# Altium PCB Car_wash_machine.PcbDoc (part 3 of 6)
Units mm, origin at the board's own origin, x right, y up, seen from the top; angles counter-clockwise.
Board outline 229.74 x 149.86 mm, 2 copper layers (Top Layer, Bottom Layer); 256 components, 170 nets, 868 pads, 731 vias.
Unrouted connection lines stored in the file: 362.
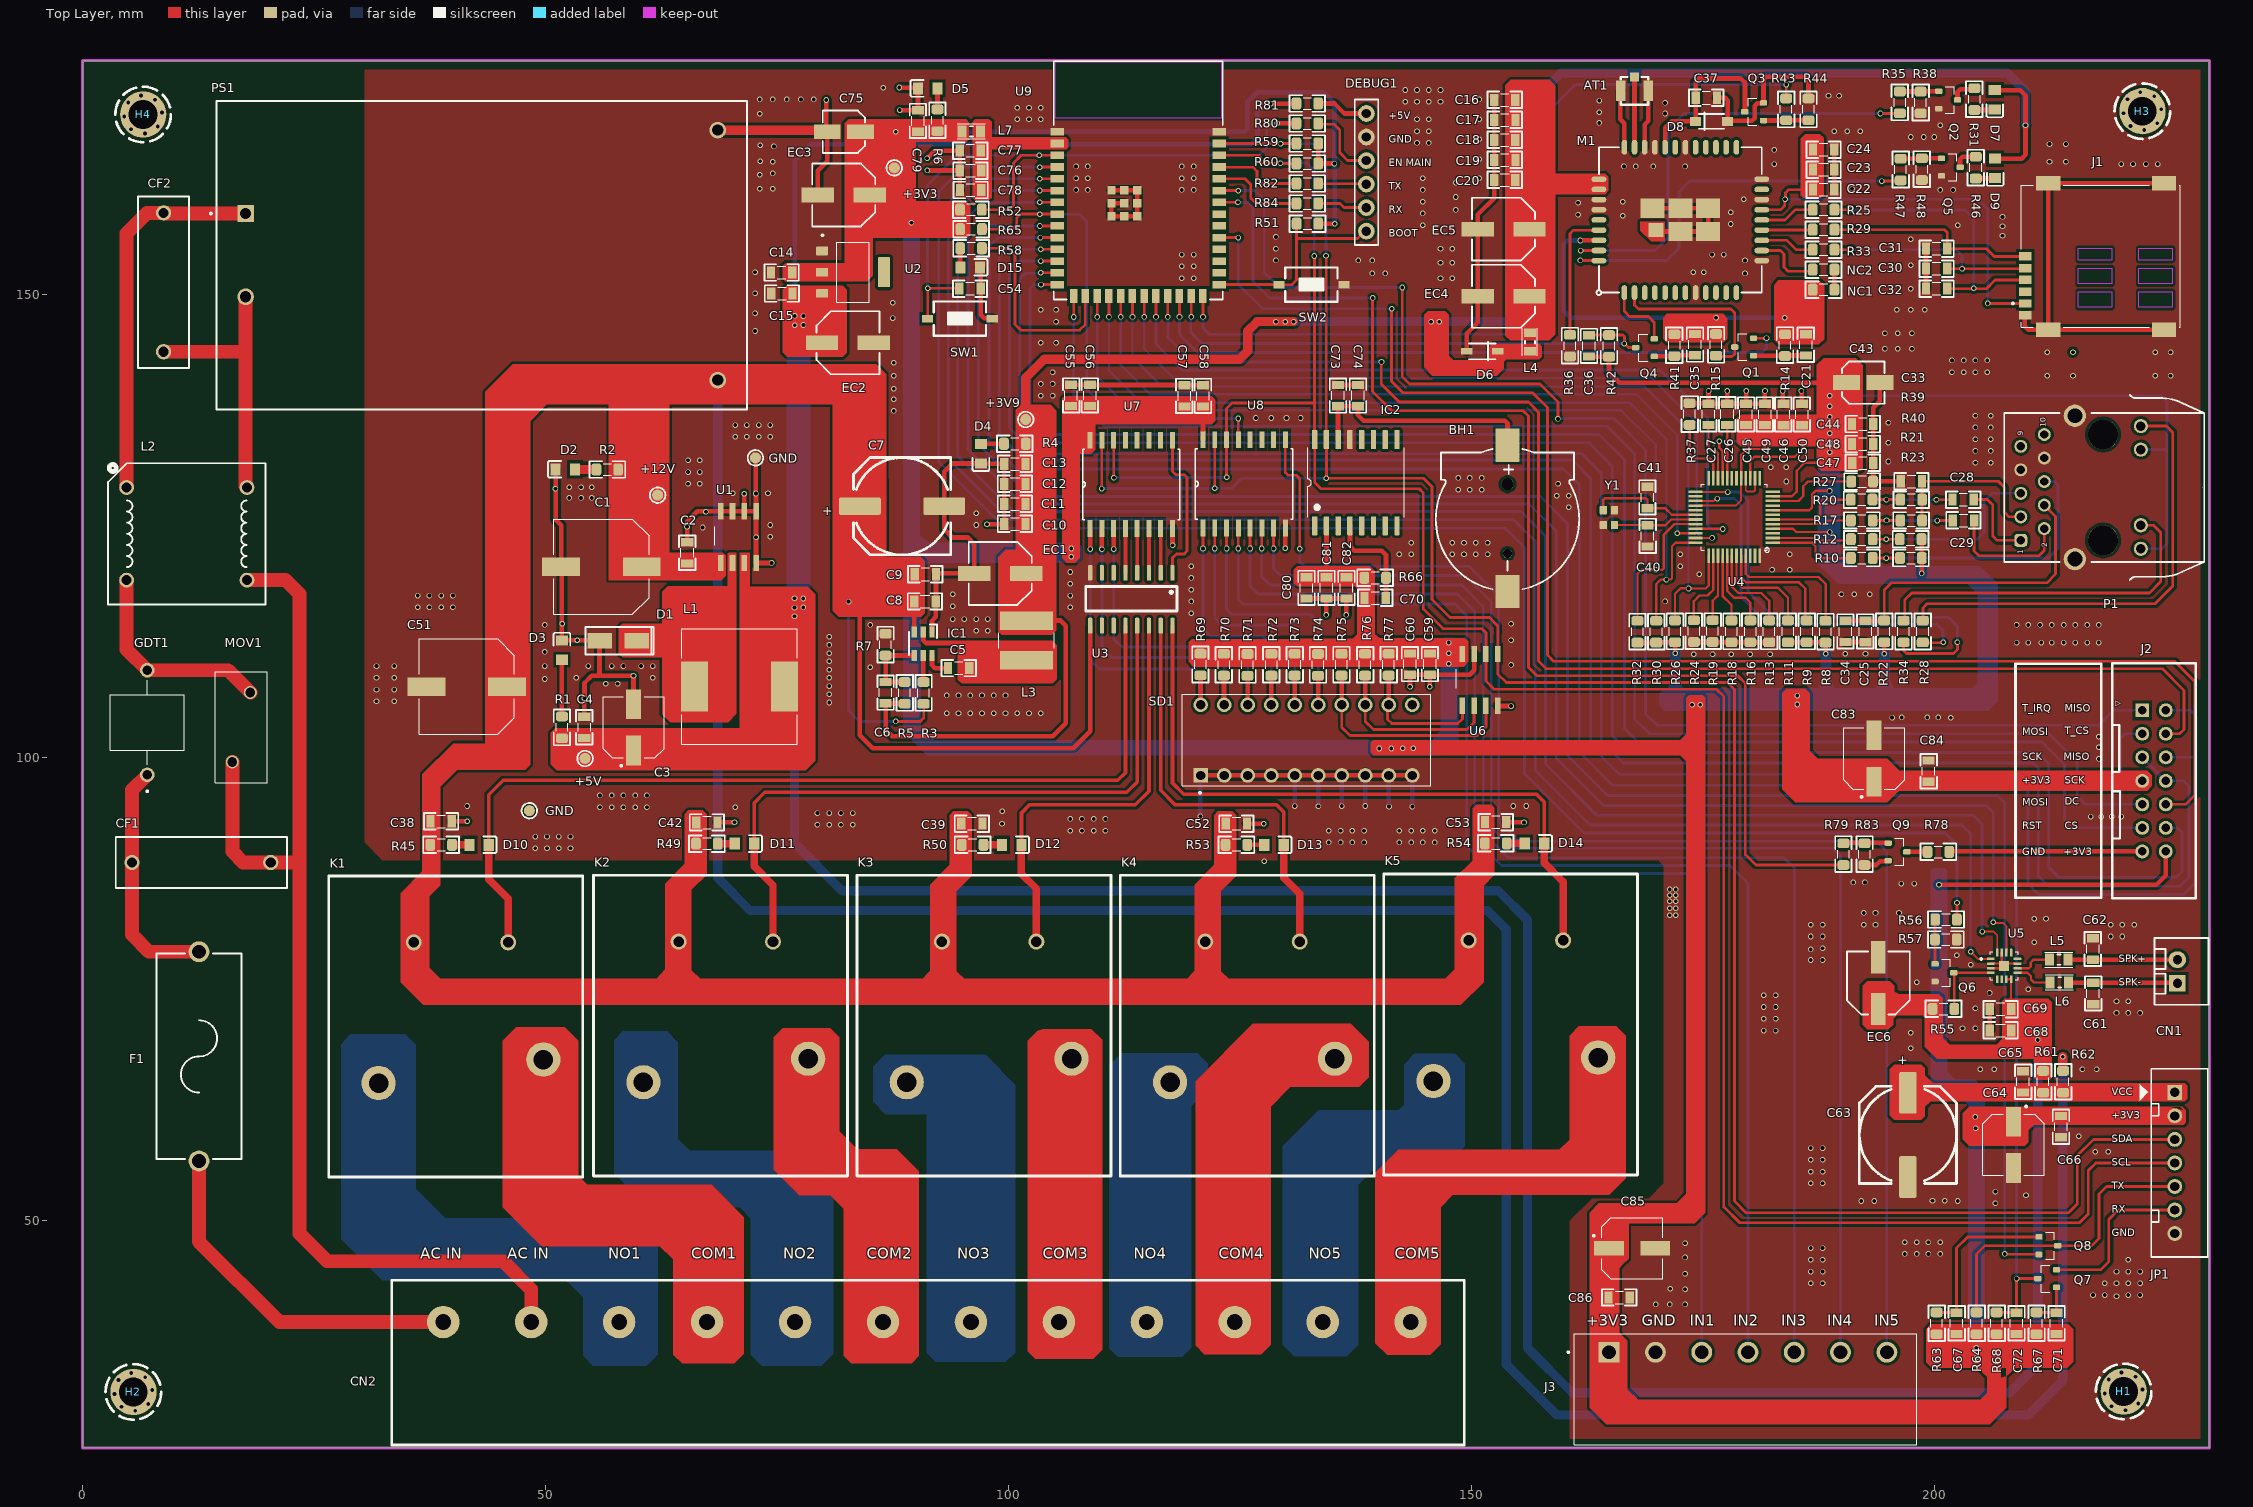
[diagram p0: Top Layer view]

## Part data (continued)
MOV1: library part "MOV_TH; 470V, 2500A, DISC 10MM", "MOV-10D Series Metal Oxide Varistor 252pF 25A, Clamping 775V, Varistor 470V, T&R", Manufacturer=Bourns, Manufacturer Part Number=MOV-10D471KTR, Supplier Part Number 1=118-MOV-10D471KTRCT-ND, Category=Varistors, ComponentLink1Description=https://datasheet.ciiva.com/4540/mov10d-4540969.pdf?src-supplier=Mouser, ComponentLink1URL=https://datasheet.ciiva.com/4540/mov10d-4540969.pdf?src-supplier=Mouser, ComponentLink2Description=https://datasheet.ciiva.com/3026/mov10d-3026310.pdf?src-supplier=Avnet, ComponentLink2URL=https://datasheet.ciiva.com/3026/mov10d-3026310.pdf?src-supplier=Avnet, ComponentLink3Description=https://datasheet.ciiva.com/369/mov10d-369331.pdf?src-supplier=Digikey, ComponentLink3URL=https://datasheet.ciiva.com/369/mov10d-369331.pdf?src-supplier=Digikey, ComponentLink4Description=https://datasheet.ciiva.com/6991/mov10d-6991770.pdf?src-supplier=Digikey, ComponentLink4URL=https://datasheet.ciiva.com/6991/mov10d-6991770.pdf?src-supplier=Digikey, LIBRARY MADE BY="MR. XUAN SIEU", LINK ORIGINAL=https://www.digikey.com/en/products/detail/bourns-inc/MOV-10D471KTR/3767915?curr=usd&utm_campaign=buynow&utm_medium=aggregator&utm_source=octopart, LINK VIET NAM=https://linhkienchatluong.vn/tu-chong-set---varistor/tu-chong-set-varistor-10d471k-470v-10mm_sp1161_ct1337.aspx, Pricing 1="1=0.25, 10=0.172, 25=0.1524, 100=0.1306, 250=0.12016 (USD)", RoHS=Yes, Stock 1=12167, Supplier 1=Digikey
NC1 R5 R38 R44 R48: library part "RES_SMD; 47K, 1%, 0805, 1/8W", "125Mw Thick Film Resistors 100Ppm/ 1% 47K 0805 Chip Resistor Surface Mount Rohs", Case Code (Imperial)=0805, Case Code (Metric)=2012, Manufacturer=Yageo, Manufacturer Part Number=RC0805FR-0747KL, Max Operating Temperature=155°C, Max Power Dissipation=125mW, Min Operating Temperature=-55°C, Resistance=47kR, Resistance Tolerance=1%, Resistor Type="Thick Film", Supplier Part Number 1=311-47.0KCRCT-ND, Temperature Coefficient=100ppm/°C, Voltage Rating=150V, Case/Package=0805, Category="Chip SMD Resistors", ComponentLink1Description=https://datasheet.ciiva.com/7941/1686128-7941799.pdf?src-supplier=Element14, ComponentLink1URL=https://datasheet.ciiva.com/7941/1686128-7941799.pdf?src-supplier=Element14, ComponentLink2Description=https://datasheet.ciiva.com/46447/444164-46447581.pdf?src-supplier=Element14, ComponentLink2URL=https://datasheet.ciiva.com/46447/444164-46447581.pdf?src-supplier=Element14, ComponentLink3Description=https://datasheet.ciiva.com/7941/444164-7941800.pdf?src-supplier=Element14, ComponentLink3URL=https://datasheet.ciiva.com/7941/444164-7941800.pdf?src-supplier=Element14, ComponentLink4Description=https://datasheet.ciiva.com/7941/444164-7941801.pdf?src-supplier=Element14, ComponentLink4URL=https://datasheet.ciiva.com/7941/444164-7941801.pdf?src-supplier=Element14, ComponentLink5Description=https://datasheet.ciiva.com/16742/rc0805-16742265.pdf?src-supplier=Future+Electronics, ComponentLink5URL=https://datasheet.ciiva.com/16742/rc0805-16742265.pdf?src-supplier=Future+Electronics, Contact Plating=Tin,Matte, Features="Moisture Resistant", Height=0.5mm, Lead Free=5697LeadFree, Length=2mm, LIBRARY MADE BY="MR. XUAN SIEU", LINK ORIGINAL=https://www.digikey.com/en/products/detail/yageo/RC0805FR-0747KL/727973, LINK VIET NAM=https://linhkien.cxtvn.com/1960-dien-tro-0805-5-thong-so-tu-1k-den-91k.html, Number of Pins=2, Number of Terminations=2, Packaging="Tape and Reel", Power Rating=125mW, Pricing 1="1=0.1, 10=0.012, 100=0.0112, 1000=0.00816 (USD)", Reach SVHC Compliant=Unknown, RoHS=Yes, RoHS Compliant=Yes, Series=RC, Size Code=0805, Stock 1=133607, Supplier 1=Digikey, Termination=SMD/SMT, Tolerance=1%, Voltage Rating (AC)=150V, Voltage Rating (DC)=150V, Width=1.25mm
NC2 R61 R62 R81 R82 R84: library part "RES_SMD; 0R 5% 1/8W 0805", "0 Ohms Jumper Chip Resistor 0805 (2012 Metric) Anti-Sulfur, Automotive AEC-Q200, Moisture Resistant Thick Film", Case/Package=339Case, Manufacturer Cross=Bourns, Manufacturer Part Number=CR0805AJ/-000EAS, Max Operating Temperature=155°C, Min Operating Temperature=-55°C, Power Rating=125mW, Resistance=0R, Supplier Part Number 1=CR0805AJ/-000EASCT-ND, Tolerance=5%, Voltage Rating=150V, Category="Chip SMD Resistors", ComponentLink1Description=https://www.bourns.com/docs/product-datasheets/crxxxxa-as.pdf?src-supplier=Digikey, ComponentLink1URL=https://www.bourns.com/docs/product-datasheets/crxxxxa-as.pdf?src-supplier=Digikey, ComponentLink2Description=https://datasheet.octopart.com/CR0805AJ--000EAS-Bourns-datasheet-166097895.pdf?src-supplier=Electro+Sonic, ComponentLink2URL=https://datasheet.octopart.com/CR0805AJ--000EAS-Bourns-datasheet-166097895.pdf?src-supplier=Electro+Sonic, ComponentLink3Description="Link Viet Nam", ComponentLink3URL=https://linhkien.cxtvn.com/2899-dien-tro-0805-1-thong-so-tu-0r-den-910r.html, ComponentLink4Description="Link Original", ComponentLink4URL=https://www.digikey.com/en/products/detail/bourns-inc/CR0805AJ-000EAS/10240129, ComponentLink5Description="Link Cross", ComponentLink5URL=https://www.lcsc.com/product-detail/Chip-Resistor-Surface-Mount_BOURNS-CR0805AJ-000EAS_C4183615.html?s_z=n_CR0805AJ%2F-000EAS, Height=600um, LIBRARY MADE BY="MR. XUAN SIEU", Pricing 1="1=0.1, 10=0.034, 50=0.0212, 100=0.0177, 500=0.01208, 1000=0.01043 (USD)", RoHS=Yes, Stock 1=21112, Supplier 1=Digikey, Voltage Rating (DC)=150V
P1: "HY931147C", Supplier=MHT
PS1: library part "MODULE_TH; POWER 220Vto 5V20W; HLK-20M12_1", "20W ultra-small series module power supply", Package="Non-Standard Hi-link", Availability="Not in stock", Check_prices=https://www.snapeda.com/parts/HLK-20M05/Hi-link/view-part/?ref=eda, LIBRARY MADE BY="MR. XUAN SIEU", LINK ORIGINAL=https://lcsc.com/product-detail/Power-Modules_HI-LINK-HLK-20M05_C465406.html, LINK VIET NAM=https://linhkienchatluong.vn/nguon-dimmer---module-nguon/module-nguon-ac-dc-5v-20w-hlk-20m05-chinh-hang-hi-link_sp1282_ct15130.aspx, MF=Hi-link, MP=HLK-20M05, Price=None, SnapEDA_Link=https://www.snapeda.com/parts/HLK-20M05/Hi-link/view-part/?ref=snap
Q1 Q2 Q3 Q4 Q5 Q7 Q8: library part "TRANS-BJT_SMD; NPN, 25V, 1.5A, SOT-23, SS8050-G", "Trans Gp Bjt NPN 25V 1.5A 300MW 3-PIN SOT-23 T/r", Case/Package=TO-236-3, Collector Base Voltage (VCBO)=40V, Collector Emitter Breakdown Voltage=25V, Collector Emitter Saturation Voltage=500mV, Collector-emitter Voltage-Max=400mV, Emitter Base Voltage (VEBO)=5V, Manufacturer Cross=Comchip, Manufacturer Part Number=SS8050-G, Max Collector Current=1.5A, Max Operating Temperature=150°C, Max Power Dissipation=300mW, Supplier Part Number 1=641-1790-1-ND, Transition Frequency=100MHz, Category=Transistors, ComponentLink1Description="http://www.comchiptech.com/admin/files/product/SS8050-G RevA181526.pdf?src-supplier=Digikey", ComponentLink1URL="http://www.comchiptech.com/admin/files/product/SS8050-G RevA181526.pdf?src-supplier=Digikey", ComponentLink2Description="Link Viet Nam", ComponentLink2URL=https://linhkien.cxtvn.com/6446-mmss8050-l-tp-transistor-npn-25v-15a-sot-23.html, ComponentLink3Description="Link Original", ComponentLink3URL=https://www.digikey.com/en/products/detail/comchip-technology/SS8050-G/6138901, ComponentLink4Description="Link Cross", ComponentLink4URL=https://www.lcsc.com/product-detail/Bipolar-BJT_Comchip-SS8050-G_C3199946.html?s_z=n_SS8050-G, Height=1.15mm, hFE Min=200, LIBRARY MADE BY="MR. XUAN SIEU", Max Breakdown Voltage=25V, Mount="Surface Mount", Number of Elements=1, Packaging="Cut Tape", Power Dissipation=300mW, Pricing 1="1=0.24, 10=0.148, 100=0.0921, 500=0.06754, 1000=0.05958 (USD)", RoHS=Yes, RoHS Compliant=Yes, Series=-, Stock 1=130674, Supplier 1=Digikey